# Altium PCB EspejoCorriente.PcbDoc
Units mm, origin at the board's own origin, x right, y up, seen from the top; angles counter-clockwise.
Board outline 100 x 100 mm, 2 copper layers (Top Layer, Bottom Layer); 16 components, 7 nets, 31 pads, 0 vias.
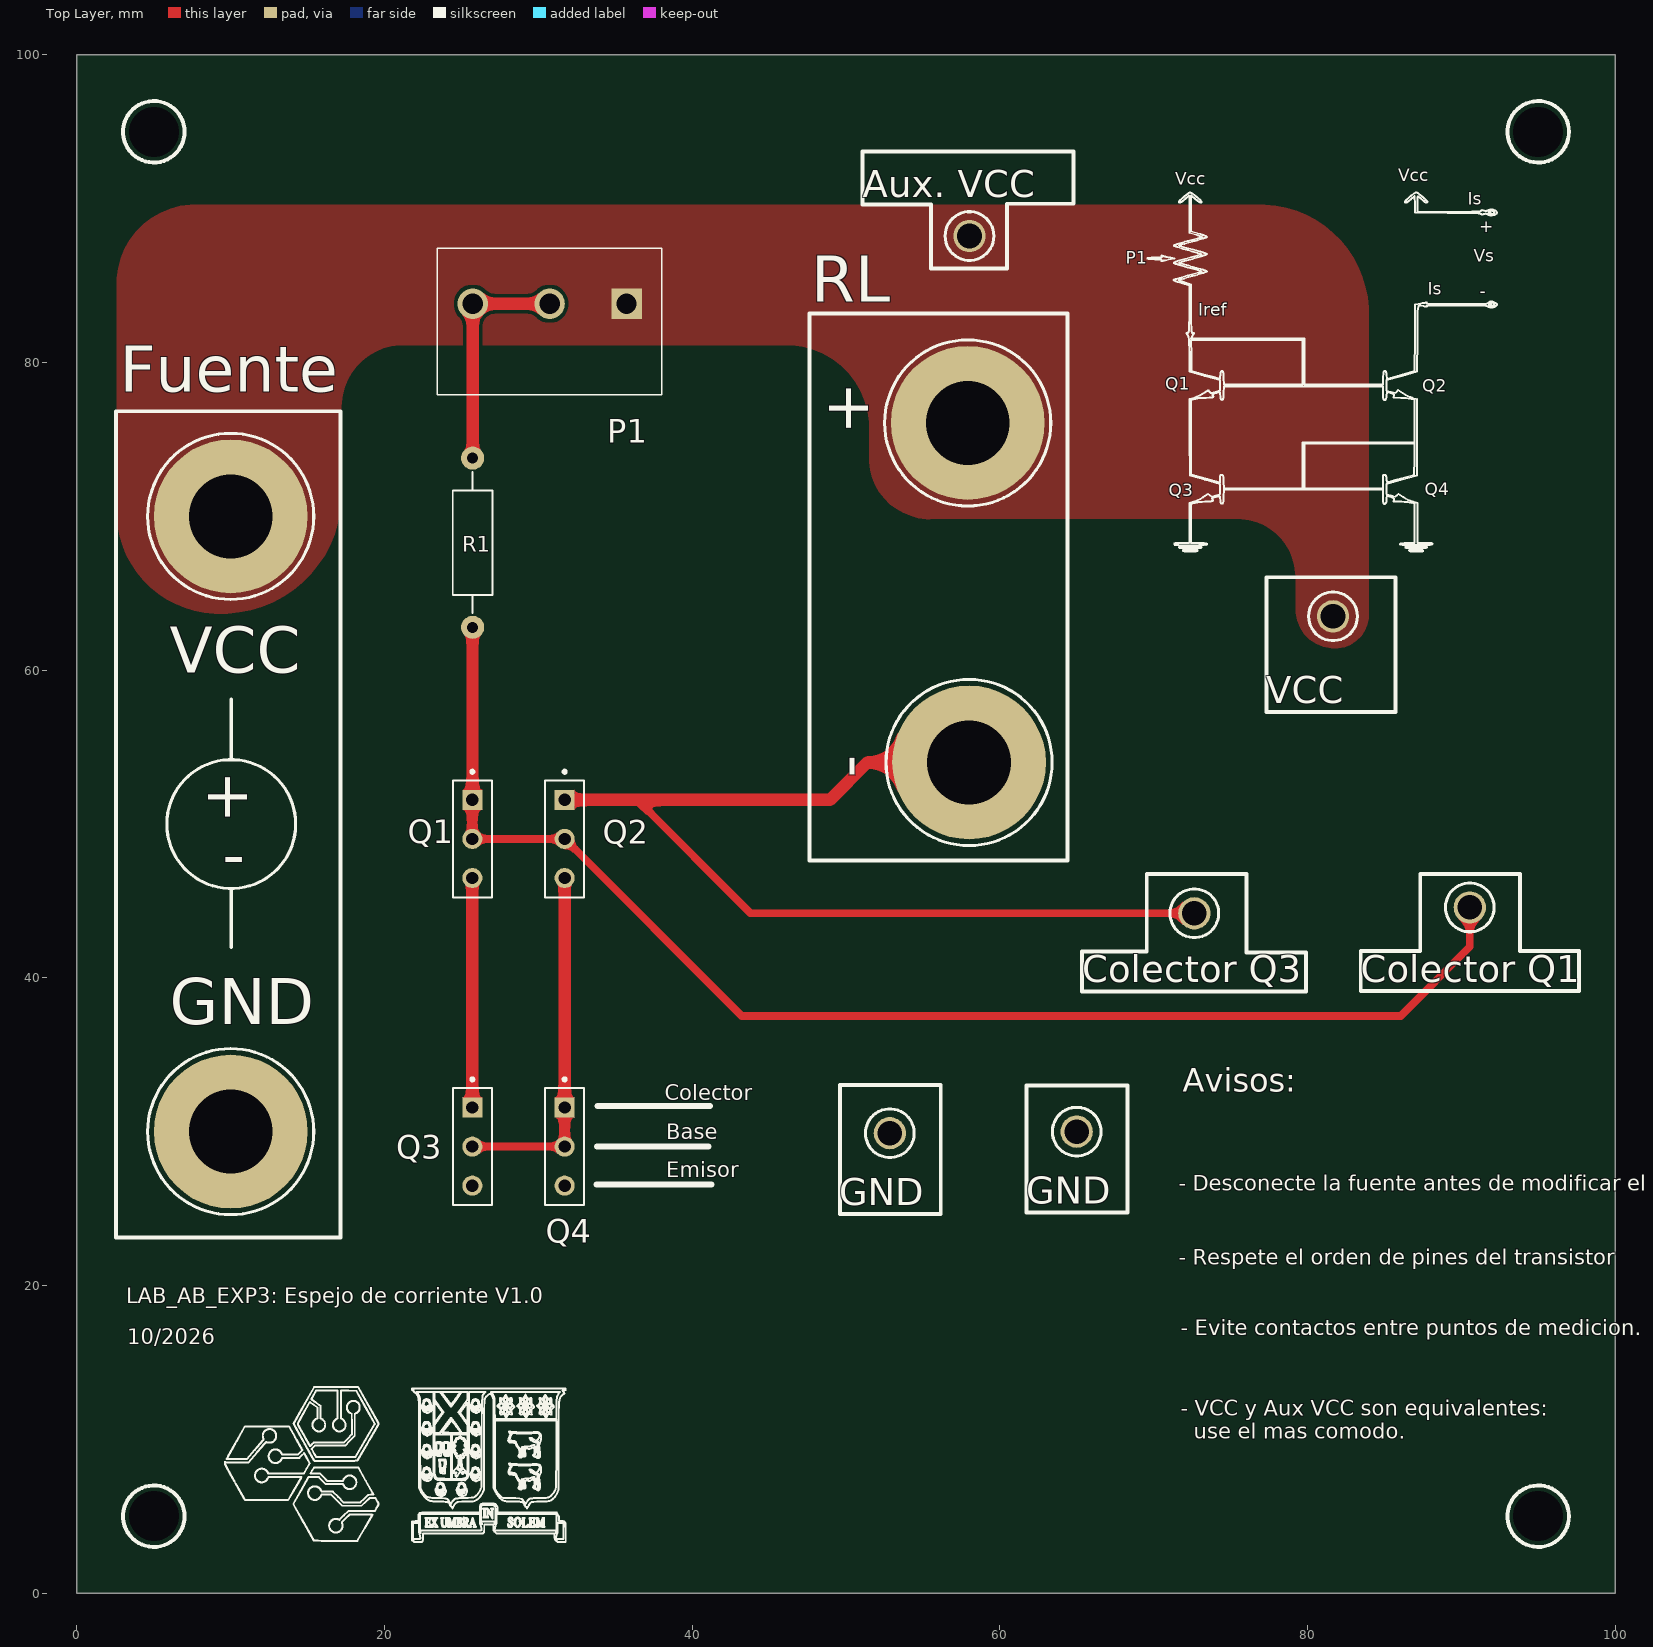
[diagram p0: Top Layer view]
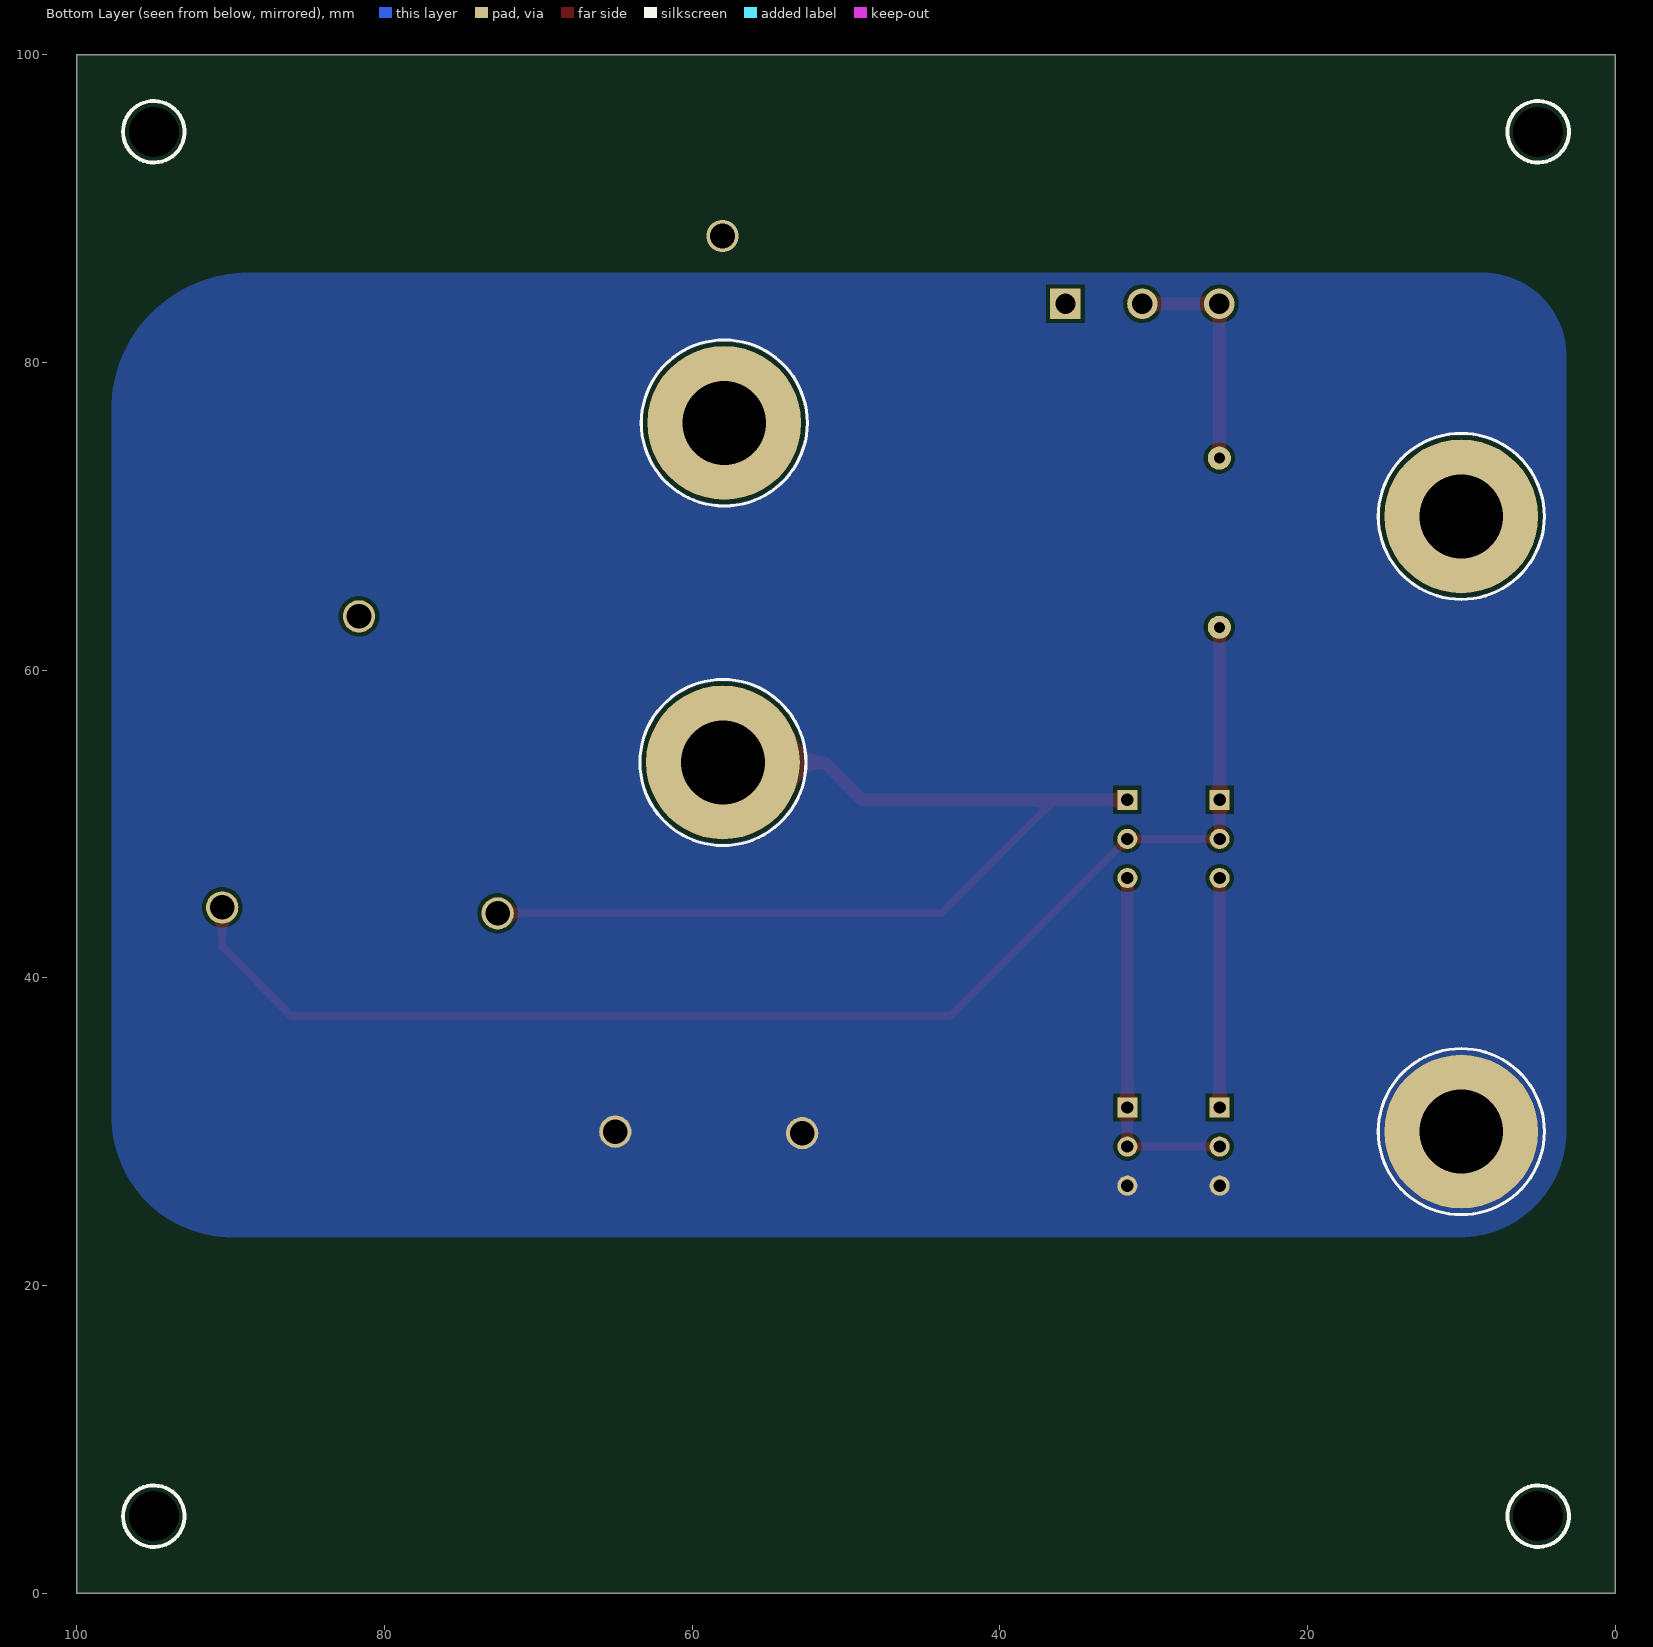
[diagram p1: Bottom Layer view, seen from below]

## Layer stack, top to bottom
Top Solder: solder mask 0.0102, Solder Resist, Dk 3.5
Top Layer: signal copper 0.0356
Dielectric 1: dielectric 0.32, FR-4, Dk 4.8
Bottom Layer: signal copper 0.0356
Bottom Solder: solder mask 0.0102, Solder Resist, Dk 3.5

## Board outline
0,0 0,100 100,100 100,0

## Design rules (kind name [scope] priority, off if disabled: settings)
Clearance [All] p1: gap=0.254 ignorepadtopadclearanceinfootprint=FALSE
HoleSize [All] p1: absolutevalues=TRUE maxlimit=10 minlimit=0.025 maxpercent=80.000 minpercent=20.000
PolygonConnect [All] p1: connectstyle=Direct reliefconductorwidth=0.254 reliefentries=4 polygonreliefangle="90 Angle" airgapwidth=0.254
RoutingVias [All] p1: holewidth=0.711 width=1.27 viastyle="Through Hole" minholewidth=0.711 minwidth=1.27 maxholewidth=0.711 maxwidth=1.27
SolderMaskExpansion [All] p1: expansion=0 istentingtop=FALSE
SupplyNets "Schematic Supply Nets_1" [InNet('GND')] p1: voltage=0.000
SupplyNets "Schematic Supply Nets" [InNet('VCC')] p2: voltage=0.000
Width [All] p1: maxlimit=0.7 minlimit=0.254 preferedwidth=0.254
29 further rules are at their usual default settings.

## Components (designator, comment, footprint, x,y, rotation, side; value= is the part's Value field where it differs from the comment)
+ "575-4" KSTN-575-4 57.912,76.073 r0 top (schematic designator TP9)
- "575-4" KSTN-575-4 58,54 r0 top (schematic designator TP10)
"Aux. VCC" "5014" KSTN-5014_V 58.025,88.223 r180 top (schematic designator TP5)
"Colector Q1" "5012" KSTN-5012_V 90.551,44.577 r180 top (schematic designator TP4)
"Colector Q3" "5013" KSTN-5013_V 72.644,44.196 r180 top (schematic designator TP6)
GND "5011" KSTN-5011_V 65,30 r180 top (schematic designator TP8)
GND "5011" KSTN-5011_V 52.849,29.898 r0 top (schematic designator TP7)
GND "575-4" KSTN-575-4 10,30 r0 top (schematic designator TP2)
P1 "PDB181-K420K-502B" PDB181K220K104B 35.734,83.82 r90 top (schematic designator VR1)
Q1 "Zocalo_3pines" Zocalo_3pines 25.707,49.028 r90 top locked (schematic designator J1)
Q2 "Zocalo_3pines" Zocalo_3pines 31.707,49.028 r90 top locked (schematic designator J3)
Q3 "Zocalo_3pines" Zocalo_3pines 25.707,29.028 r90 top locked (schematic designator J2)
Q4 "Zocalo_3pines" Zocalo_3pines 31.707,29.028 r90 top locked (schematic designator J4)
R1 "Zocalo_Resistencia_1/4W" Resistencia 25.73,73.787 r270 top
VCC "5010" KSTN-5010_V 81.661,63.5 r180 top (schematic designator TP3)
VCC "575-4" KSTN-575-4 10,70 r0 top locked (schematic designator TP1)

## Footprints (in the part's own frame and the unit in brackets; to place one, negate y for a bottom-side part, rotate by r counter-clockwise, add the part's x,y. Pads: shape width x height; smd on the part's side, far side on the other; paste and mask are expansions set on the pad)
KSTN-575-4 [mm] "Banana Jack, Non-Insulated, Dia 7.92mm"
  round 10 hole 5.45: 1(0,0)
  silkscreen extent -5.4,-5.4 5.4,5.4, body extent -3.98,-3.96 3.92,3.94, height 2.36
KSTN-5010_V [mm] "Test Point, Dia 3.17mm"
  round 2.1 hole 1.6: 1(0,0)
  silkscreen extent -1.59,-1.58 1.59,1.58, body extent -1.59,-1.59 1.59,1.59, height 8.13
KSTN-5011_V [mm] "Test Point, Dia 3.17mm"
  round 2.1 hole 1.6: 1(0,0)
  silkscreen extent -1.59,-1.58 1.59,1.58, body extent -1.59,-1.59 1.59,1.59, height 8.13
KSTN-5012_V [mm] "Test Point, Dia 3.17mm"
  round 2.1 hole 1.6: 1(0,0)
  silkscreen extent -1.59,-1.58 1.59,1.58, body extent -1.59,-1.59 1.59,1.59, height 8.13
KSTN-5013_V [mm] "Test Point, Dia 3.17mm"
  round 2.1 hole 1.6: 1(0,0)
  silkscreen extent -1.59,-1.58 1.59,1.58, body extent -1.59,-1.59 1.59,1.59, height 8.13
KSTN-5014_V [mm] "Test Point, Dia 3.17mm"
  round 2.1 hole 1.6: 1(0,0)
  silkscreen extent -1.59,-1.58 1.59,1.58, body extent -1.59,-1.59 1.59,1.59, height 8.13
PDB181K220K104B [mm]
  rect 1.98x1.98 hole 1.32: 1(0,0)
  round 1.98 hole 1.32: 2(0,5) 3(0,10)
  silkscreen extent -5.9,-2.3 3.6,12.3, body extent -5.58,-3.5 18.92,13.49, height 21.2
Resistencia [mm]
  round 1.5 hole 0.711: 1(0,0) 2(11,0)
  silkscreen extent 0.89,-1.3 10.08,1.3, body extent -1.27,-1.27 12.27,1.27, height 6.39
Zocalo_3pines [mm]
  rect 1.308x1.308 / inner round 1.308 / far side rect 1.308x1.308 hole 0.8: 1(2.54,0)
  round 1.308 hole 0.8: 2(0,0) 3(-2.54,0)
  silkscreen extent -3.81,-1.27 4.47,1.27, body extent -3.81,-1.96 3.81,1.27, height 14

## Part data
+ - GND VCC: library part CMP-2000-05649-1, "Banana Jack, Non-Insulated, 1-Pin THD, RoHS, Bulk", Color=-, Manufacturer=Keystone-Electronics, Package Description="1-Pin Through Hole Device, Dia 7.92 mm", Package Version="Rev. B, 11/1994", Body Material=-, Category=Connectors,Interconnects, Contact Finish=Nickel, Contact Material=Brass, Datasheet URL=http://www.keyelco.com/product-pdf.cfm?p=2379, Datasheet Version="Rev. B, 11/1994", Family=BananaandTipConnectors-Jacks,Plugs, Features=-, Gender=Female, Insulation=Non-Insulated, Manufacturer URL=http://www.keyelco.com/, Mounting Technology=ThroughHole, Mounting Type=ThroughHole, Operating Temperature=-, Package Reference=575-4, Package URL=http://www.keyelco.com/product-pdf.cfm?p=2379, Packaging=Bulk, Plug/Mating Plug Diameter=StandardBanana, Series=-, Termination=Solder, Type=BananaJack, Wire Gauge=-
"Aux. VCC": library part CMP-1672-00006-4, "Test Point, Yellow, Through Hole, RoHS, Bulk", Colour=Yellow, Manufacturer=Keystone, Package Quantity=100, ComponentLink1Description="Manufacturer URL", ComponentLink1URL=http://www.keyelco.com/, ComponentLink2Description=Datasheet, ComponentLink2URL=http://www.keyelco.com/product-pdf.cfm?p=1323, Contact Material=Bronze, Contact Plating=Silver, DatasheetVersion="Rev. F, 12/2013", Height="8.12 mm", Mount="Through Hole", Mounting Technology="Through Hole", PackageDescription="1-Pin Through Hole Device, Dia 3.17 mm", PackageReference=5014, Packaging=Bulk, REACH SVHC="No SVHC", RoHSCompliant=true
"Colector Q1": library part CMP-1672-00004-4, "Test Point, White, Through Hole, RoHS, Bulk", Colour=White, Manufacturer=Keystone, Package Quantity=100, ComponentLink1Description="Manufacturer URL", ComponentLink1URL=http://www.keyelco.com/, ComponentLink2Description=Datasheet, ComponentLink2URL=http://www.keyelco.com/product-pdf.cfm?p=1321, Contact Material=Bronze, Contact Plating=Silver, DatasheetVersion="Rev. F, 12/2013", Height="8.12 mm", Length="11.3 mm", Mount="Through Hole", Mounting Technology="Through Hole", PackageDescription="1-Pin Through Hole Device, Dia 3.17 mm", PackageReference=5012, Packaging=Bulk, Pins=1, REACH SVHC="No SVHC", RoHSCompliant=true
"Colector Q3": library part CMP-1672-00005-4, "Test Point, Orange, Through Hole, RoHS, Bulk", Colour=Orange, Manufacturer=Keystone, Package Quantity=100, ComponentLink1Description="Manufacturer URL", ComponentLink1URL=http://www.keyelco.com/, ComponentLink2Description=Datasheet, ComponentLink2URL=http://www.keyelco.com/product-pdf.cfm?p=1322, Contact Material=Bronze, Contact Plating=Silver, DatasheetVersion="Rev. F, 12/2013", Height="8.12 mm", Mount="Through Hole", Mounting Technology="Through Hole", PackageDescription="1-Pin Through Hole Device, Dia 3.17 mm", PackageReference=5013, Packaging=Bulk, REACH SVHC="No SVHC", RoHSCompliant=True
GND GND: library part CMP-1672-00003-4, "Test Point, Black, Through Hole, RoHS, Bulk", Colour=Black, Manufacturer=Keystone, Package Quantity=100, ComponentLink1Description="Manufacturer URL", ComponentLink1URL=http://www.keyelco.com/, ComponentLink2Description=Datasheet, ComponentLink2URL=http://www.keyelco.com/product-pdf.cfm?p=1320, Contact Material=Bronze, Contact Plating=Silver, DatasheetVersion="Rev. F, 12/2013", Height="8.12 mm", Mount="Through Hole", Mounting Technology="Through Hole", PackageDescription="1-Pin Through Hole Device, Dia 3.17 mm", PackageReference=5011, Packaging=Bulk, Pins=1, REACH SVHC="No SVHC", RoHSCompliant=true
P1: "Variable Resistor", Manufacturer_Name=Bourns, Mouser Part Number=652-PDB181-K420K502B, Arrow Part Number=PDB181-K420K-502B, Arrow Price/Stock=https://www.arrow.com/en/products/pdb181-k420k-502b/bourns?region=nac, Datasheet Link=https://www.bourns.com/docs/product-datasheets/PDB18.pdf, Height=16.5mm, Manufacturer_Part_Number=PDB181-K420K-502B, Mouser Price/Stock=https://www.mouser.co.uk/ProductDetail/Bourns/PDB181-K420K-502B?qs=Ivs1Be2ZGq6EMYRq4LQhiA%3D%3D
Q1 Q2 Q3 Q4: Package=None, Availability=Unavailable, MP=D01-9970342, Price=None
R1: "1.07 kOhms Â±1% 0.25W, 1/4W Through Hole Resistor Axial - Metal Film", Package="RADIAL-2 YAGEO", Check_prices=https://www.snapeda.com/parts/MFR-25FBF52-1K/Yageo/view-part/?ref=eda, MF=Yageo, MP=MFR-25FBF52-1K, SnapEDA_Link=https://www.snapeda.com/parts/MFR-25FBF52-1K/Yageo/view-part/?ref=snap
VCC: library part CMP-1672-00002-4, "Test Point, Red, Through Hole, RoHS, Bulk", Colour=Red, Manufacturer=Keystone, Package Quantity=100, ComponentLink1Description="Manufacturer URL", ComponentLink1URL=http://www.keyelco.com/, ComponentLink2Description=Datasheet, ComponentLink2URL=http://www.keyelco.com/product-pdf.cfm?p=1319, Contact Material=Bronze, Contact Plating=Silver, DatasheetVersion="Rev. F, 12/2013", Height="8.12 mm", Mount="Through Hole", Mounting Technology="Through Hole", PackageDescription="1-Pin Through Hole Device, Dia 3.17 mm", PackageReference=5010, Packaging=Bulk, Pins=1, REACH SVHC="No SVHC", RoHSCompliant=true

## Free pads (board coordinates)
  round 0 hole 3.25: 8(5,5) 8(5,95) 8(95,5) 8(95,95)

## Nets (pads, with @x,y where several pads share a name; then routed paths per layer and width w, separated by ;. In a path a pad name is that pad's centre, name@x,y a point inside that pad or via, vN(x,y) a via of type N, cw(c..) or ccw(c..) an arc to the next point about the centre after c; other vN are vias at no path point)
Col/Base_1: "Colector Q1.1" Q1.1 Q1.2 Q2.2 R1.2 | length 87.8
  Top Layer w0.5: Q1.2 Q2.2 43.22,37.516 86.055,37.516 90.551,42.012 90.551,44.577 ; R1.2@25.719,62.776 R1.2
  Top Layer w0.7: Q1.2 Q1.1
  Top Layer w0.8: Q1.1@25.719,51.58 R1.2@25.719,62.776
Col/Base_2: Q2.3 Q3.2 Q4.1 Q4.2 | length 23.5
  Top Layer w0.5: Q3.2 Q4.2
  Top Layer w0.7: Q4.2 Q4.1
  Top Layer w0.8: Q4.1 Q2.3
Colector_2: "Colector Q3.1" -.1 Q2.1 | length 66.6
  Top Layer w0.5: 36.417,51.568 43.79,44.196 72.644,44.196
  Top Layer w0.8: Q2.1 36.417,51.568 48.952,51.568 51.384,54 -.1
Emisor_1: Q1.3 Q3.1 | length 14.9
  Top Layer w0.8: Q3.1 Q1.3
GND: GND.1 Q3.3 Q4.3
Pot_out: P1.2 P1.3 R1.1 | length 15
  Top Layer w0.7: R1.1 R1.1@25.732,73.789 ; P1.3@25.732,83.818 P1.3
  Top Layer w0.8: R1.1@25.732,73.789 P1.3@25.732,83.818 ; P1.3 P1.2
VCC: "Aux. VCC.1" +.1 P1.1 VCC.1

## Polygon pours and split planes (outlines as drawn)
GND on Bottom Layer "GND_L02_P002" (solid, pour order 2): 10.109,23.139 26.721,23.139 89.891,23.139 ccw(c89.891,30.988) 97.739,30.988 97.739,76.962 ccw(c88.875,76.962) 88.875,85.827 8.585,85.827 ccw(c8.585,80.416) 3.175,80.416 3.175,30.074 ccw(c10.109,30.074)
VCC on Top Layer "VCC_L01_P000" (solid, pour order 0): 9.246,63.678 9.423,63.678 ccw(c9.423,71.45) 17.196,71.45 17.196,77.114 cw(c21.209,77.114) 21.209,81.128 46.152,81.128 cw(c46.152,75.768) 51.511,75.768 51.511,73.787 ccw(c55.474,73.787) 55.474,69.825 64.643,69.825 75.489,69.825 cw(c75.489,66.091) 79.223,66.091 79.223,63.983 ccw(c81.788,63.983) 81.788,61.417 ccw(c81.788,63.601) 83.972,63.602 83.972,83.21 ccw(c76.911,83.21) 76.911,90.272 7.722,90.272 ccw(c7.722,85.141) 2.591,85.141 2.591,70.333 ccw(c9.246,70.333)

## Silkscreen, mask and mechanical layers (free items; w line width, h text height)
Top Overlay:
  drawing of 26351 lines, arcs and shapes, not listed
  text "Vcc" at 85.899,91.788 h0.8
  text "Vcc" at 71.399,91.567 h0.8
  text "Is" at 90.424,90.246 h0.8
  text "+" at 91.161,88.462 h0.8
  text "Vs" at 90.805,86.538 h0.8
  text "P1" at 68.174,86.436 h0.8
  text "Is" at 87.808,84.404 h0.8
  text "-" at 91.211,84.258 h0.8
  text "RL" at 47.752,83.947 h3
  text "Iref" at 72.884,83.054 h0.8
  text "Q1" at 70.764,78.232 h0.8
  text "Q2" at 87.458,78.112 h0.8
  text "Fuente" at 2.794,78.089 h3
  text "Q4" at 87.616,71.363 h0.8
  text "Q3" at 70.968,71.323 h0.8
  text "+" at 8.542,53.458 h3 r270
  text "-" at 10.938,48.785 h3 r180
  text "Avisos:" at 71.882,32.588 h1.52
  text "Colector" at 38.227,32.055 h1
  text "Base" at 38.329,29.489 h1
  text "Emisor" at 38.303,27.051 h1
  text "- Desconecte la fuente antes de modificar el circuito." at 71.628,26.162 h1
  text "- Respete el orden de pines del transistor" at 71.628,21.336 h1
  text "LAB_AB_EXP3: Espejo de corriente V1.0" at 3.2,18.85 h1
  text "- Evite contactos entre puntos de medicion." at 71.755,16.764 h1
  text "10/2026" at 3.277,16.18 h1
  text "- VCC y Aux VCC son equivalentes: /   use el mas comodo." at 71.755,10.033 h1
Bottom Overlay:
  circle w0.254: c95,95 r2
  circle w0.254: c95,5 r2
  circle w0.254: c5,5 r2
  circle w0.254: c5,95 r2